# Altium PCB BOARD_4LAYER.PcbDoc (part 13 of 21)
Units mil, origin at the board's own origin, x right, y up, seen from the top; angles counter-clockwise.
Board outline 6692.91 x 10039.37 mil, 4 copper layers (Top Layer, Mid Layer 1, Mid Layer 2, Bottom Layer), stack 66.299 mil thick; 1532 components, 908 nets, 4105 pads, 1286 vias.
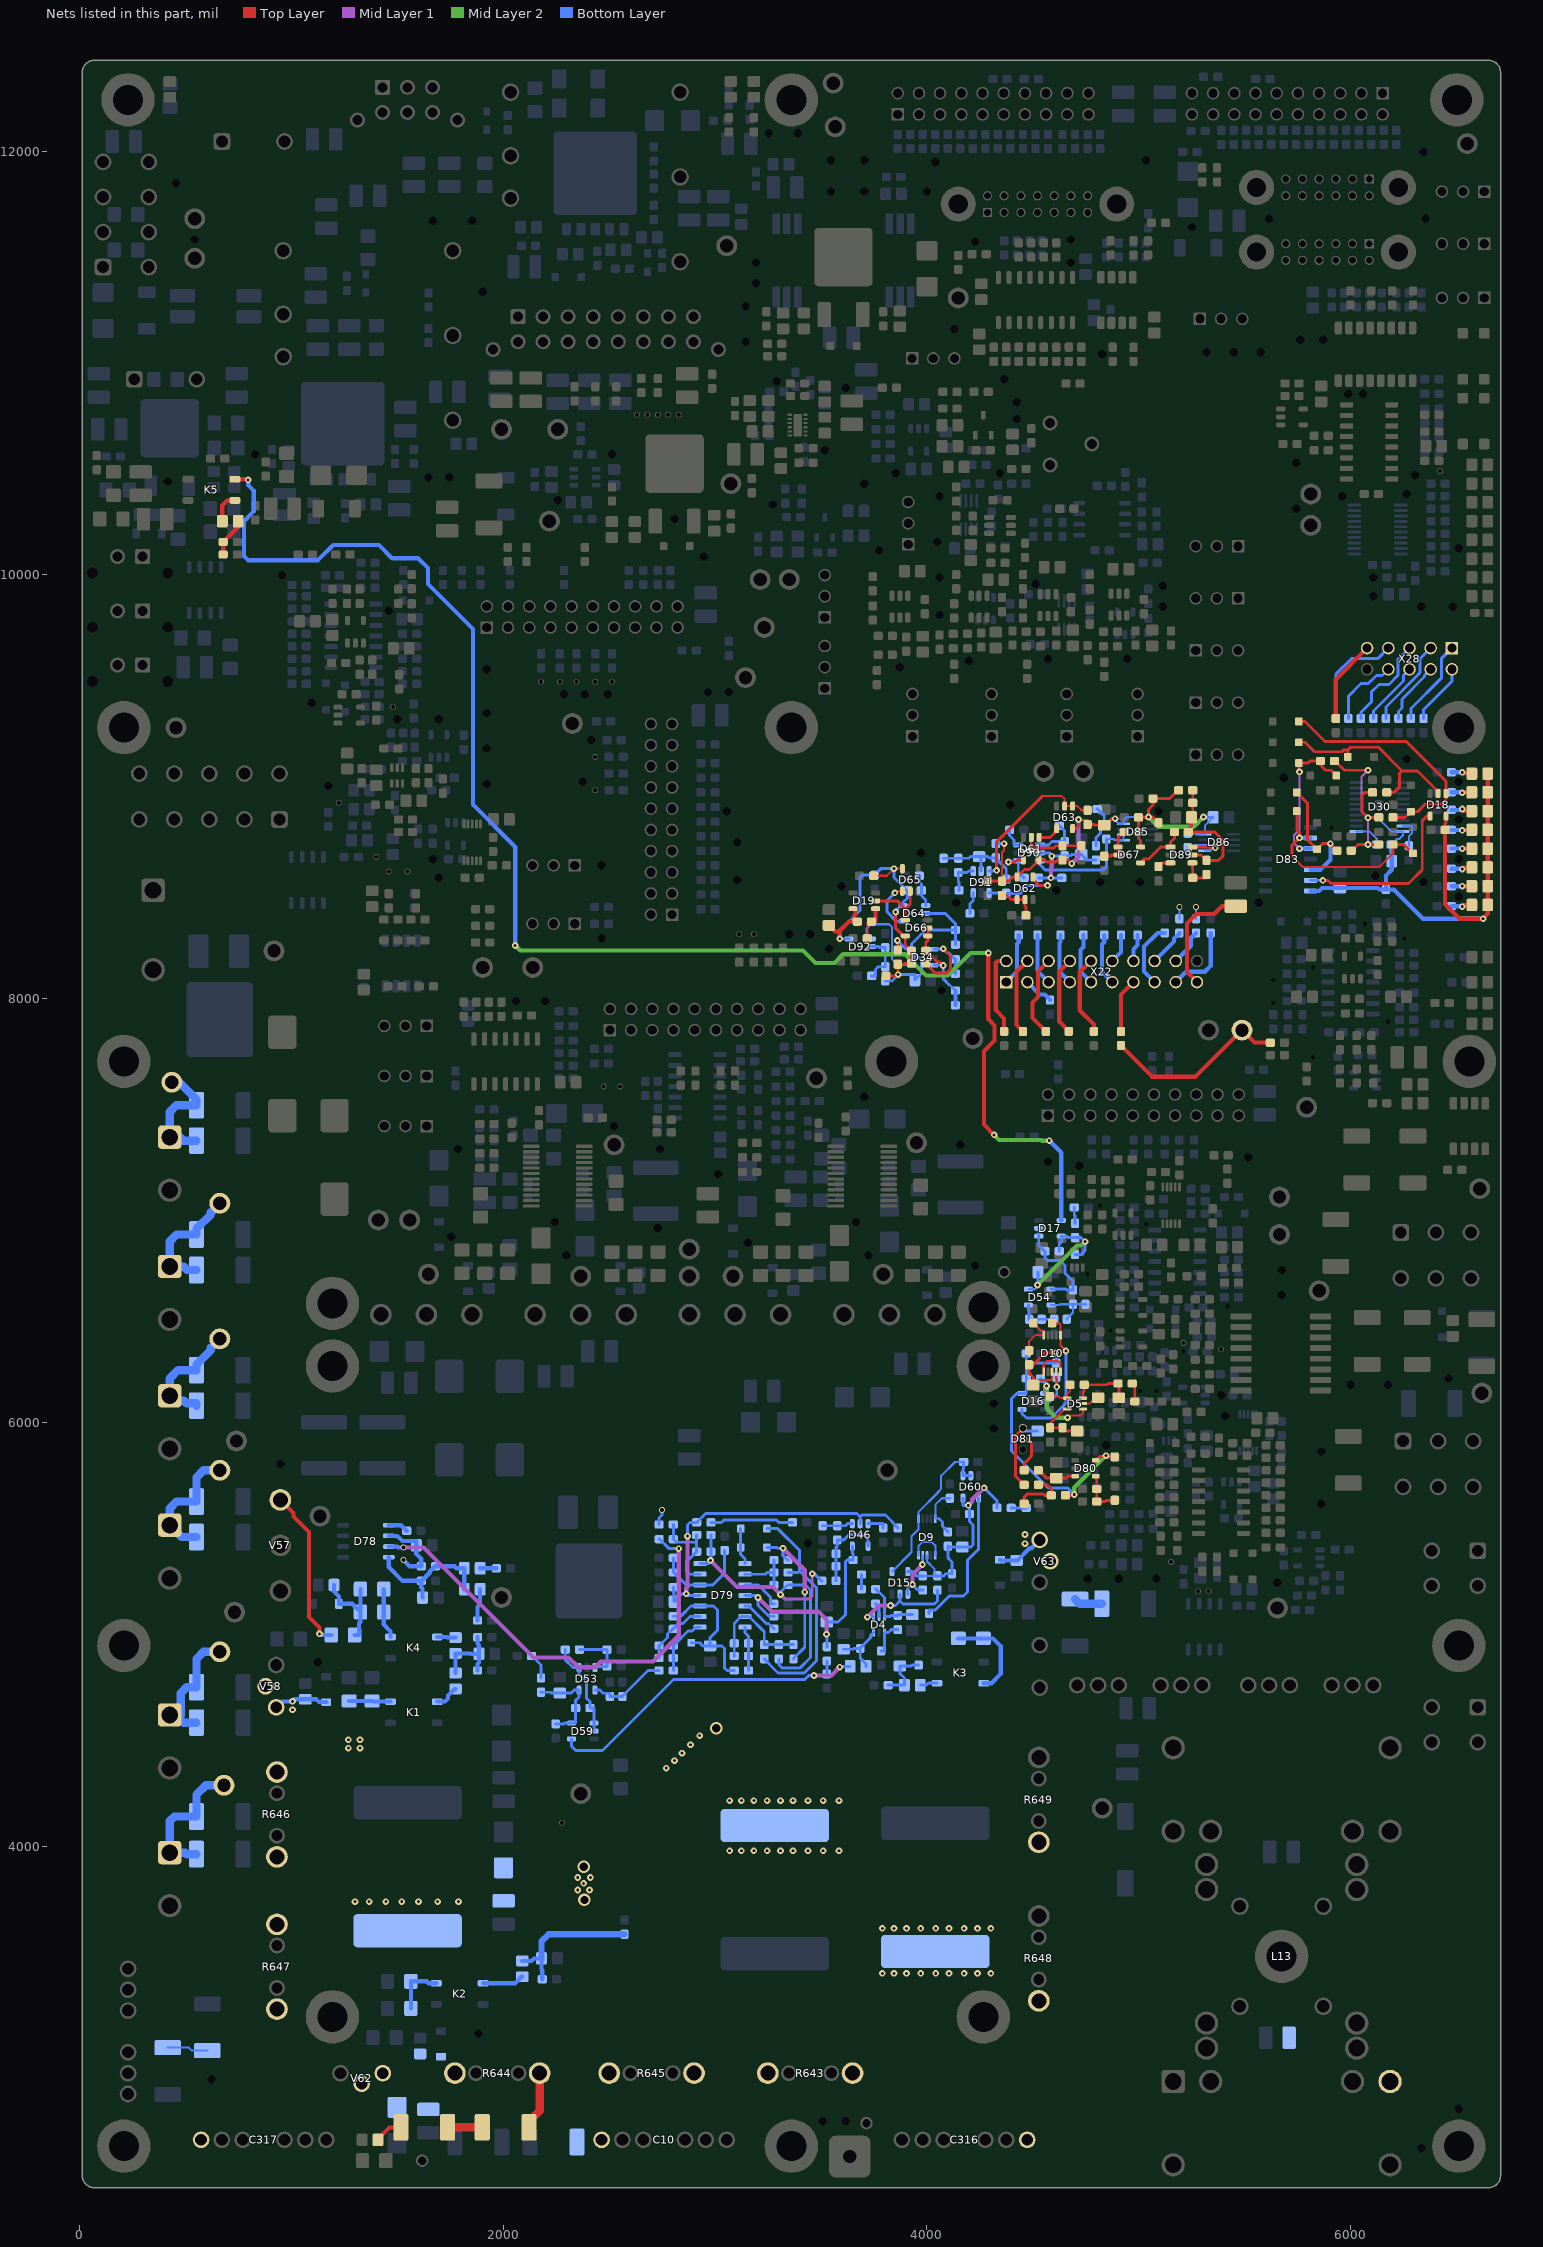
[diagram p15: the nets of this part, all layers, seen from the top]

## Via types
v1: diameter 27.56/31.5/31.5/27.56 (per signal layer), hole 13.78, Top Layer to Bottom Layer, 1270 vias
v2: diameter 59.06, hole 39.37, Top Layer to Bottom Layer, 16 vias

## Nets (pads, with @x,y where several pads share a name; then routed paths per layer and width w, separated by ;. In a path a pad name is that pad's centre, name@x,y a point inside that pad or via, vN(x,y) a via of type N, cw(c..) or ccw(c..) an arc to the next point about the centre after c; other vN are vias at no path point) (continued)
$6N106: C3.2 C10.2 R635.2 R643.2 R644.2 R645.2 R676.2 R677.2 V48.1 V49.1 V58.3 V59.1 V62.3 | length 257.3
  Bottom Layer w19.68: V58.3@929.13,4656.69 957.48,4685.04 v1(1005.91,4685.04) 1015.75,4694.88 R676.2@1066.93,4694.88 1118.03,4694.88 1130.83,4682.09 V48.1@1165.35,4682.09
  other v1: 1269.68,4464.57 1324.8,4464.57 1269.68,4503.94 1324.8,4503.94 1005.91,4645.67
$6N109: K1.4 R420.2 R421.2 | length 196.2
  Bottom Layer w19.68: R421.2@1273.62,4687.01 R420.2@1381.89,4687.01 1385.04,4683.86 K1.4@1468.5,4683.86
$6N111: K1.1 R688.2 | length 119.8
  Bottom Layer w19.68: K1.1@1688.98,4683.86 1725.47,4683.86 1740.66,4699.04 1740.66,4713.1 1771.65,4744.09 R688.2@1775.59,4744.09
$6N112: K2.4 R422.2 R423.2 | length 251.8
  Bottom Layer w19.68: R422.2@1564.96,3236.22 R423.2@1564.96,3364.17 1639.49,3364.17 1648.54,3355.12 K2.4@1685.04,3355.12
$6N114: K2.1 R689.2 | length 198
  Bottom Layer w19.68: K2.1@1905.51,3355.12 1942.01,3355.12 1942.29,3354.83 2055.62,3354.83 2086.61,3385.83 R689.2@2090.55,3385.83
$6N119: K3.4 R424.2 R425.2 | length 445.3
  Bottom Layer w19.68: R424.2@4147.64,4982.28 R425.2@4265.75,4982.28 4312.09,4982.28 4347.88,4946.49 4347.88,4814.53 4304.21,4770.87 K3.4@4267.72,4770.87
$6N121: K3.1 R690.2 | length 82.5
  Bottom Layer w13.78: R690.2@3968.5,4761.81 3997.32,4761.81 4006.38,4770.87 K3.1@4047.24,4770.87
$6N125: C71.2 C131.2 FB37.2 R688.1 R691.1 | length 365.9
  Bottom Layer w19.68: R688.1@1775.59,4818.9 R691.1@1775.59,4911.42 1847.36,4911.42 1849.33,4909.45 C131.2@1885.83,4909.45 ; FB37.2@1879.92,4830.71 1879.92,4862.2 1885.83,4868.11 C131.2@1885.83,4909.45 ; C71.2@1879.92,4988.19 1879.92,4956.69 1885.83,4950.79 C131.2@1885.83,4909.45
$6N127: R130.1 R131.2 | length 163.4
  Top Layer w39.37: R131.2@1738.19,2675.2 R130.1@1901.57,2675.2
$6N128: H2.1 R131.1 | length 135
  Top Layer w19.68: H2.1@1409.45,2616.14 1409.45,2620.08 1464.57,2675.2 R131.1@1517.72,2675.2
$6N134: R646.1 R647.1 V62.2
$6N135: C8.2 C317.2 L16.1 R646.2 R647.2 R678.2 V50.1 V58.2 V60.1 V63.3 | length 228.2
  Bottom Layer w19.68: V50.1@4344.49,5353.35 4347.44,5350.39 R678.2@4423.23,5350.39 4427.17,5350.39 4484.65,5407.88 4492.52,5407.88 V63.3@4531.5,5446.85
  other v1: 1301.18,3740.16 1368.11,3740.16 1446.85,3740.16 1521.65,3740.16 1600.39,3740.16 1690.94,3740.16 1789.37,3740.16 2352.36,3795.28 2407.48,3795.28 2379.92,3826.77 2352.36,3854.33 2411.42,3854.33 2769.68,4370.08 2809.06,4405.51 2844.49,4440.94 2883.86,4480.31 2927.17,4523.62 4462.6,5429.13 4462.6,5472.44
  other v2: 2383.86,3748.03 2379.92,3905.51 3005.91,4559.06
$6N688: R637.1 R638.2 | length 135
  Bottom Layer w39.37: R637.1@4698.82,5167.32 4720.47,5145.67 R638.2@4824.8,5145.67
$6N737: C5.1 C316.1 L13.2 L15.1
  other v1: 3789.37,3401.57 3844.49,3401.57 3903.54,3401.57 3970.47,3401.57 4041.34,3401.57 4104.33,3401.57 4175.2,3401.57 4238.19,3401.57 4301.18,3401.57 3789.37,3614.17 3844.49,3614.17 3903.54,3614.17 3970.47,3614.17 4041.34,3614.17 4104.33,3614.17 4175.2,3614.17 4238.19,3614.17 4301.18,3614.17
$6N888: R639.1 R640.2 | length 192.7
  Bottom Layer w10: R640.2@417.32,3051.18 516.65,3051.18 530.43,3037.4 R639.1@604.33,3037.4
$6N889: R684.2 V57.1 | length 766.5
  Top Layer w19.68: V57.1@948.82,5636.22 1010.91,5574.13 1010.91,5557.71 1083.94,5484.67 1083.94,5083.38 1133.86,5033.46 v1(1133.86,5003.94)
  Bottom Layer w19.68: v1(1133.86,5003.94) 1139.76,4998.03 R684.2@1188.98,4998.03
$6N890: R426.1 R427.1 R679.1 R684.1 V51.2 | length 456.7
  Bottom Layer w19.68: R679.1@1202.76,5234.25 1202.76,5202.83 1225.39,5180.2 V51.2@1225.39,5145.67 1288.4,5145.67 1288.4,5144.67 R427.1@1326.77,5106.3 ; R684.1@1299.21,4998.03 1320.55,4998.03 1320.55,5053.74 1326.77,5059.96 R427.1@1326.77,5106.3 ; R426.1@1326.77,5214.57 R427.1@1326.77,5106.3
$6N893: K4.4 R426.2 R427.2 | length 238.6
  Bottom Layer w19.68: R426.2@1437.01,5214.57 R427.2@1437.01,5106.3 1437.01,5047.13 1468.5,5015.63 K4.4@1468.5,4988.98
$6N979: R693.1 R694.1 TP12.1 X9.1 | length 568
  Bottom Layer w39.37: TP12.1@437.01,7606.3 472.44,7606.3 553.15,7525.59 R693.1@553.15,7498.03 458.99,7498.03 427.17,7466.2 X9.1@427.17,7347.44 475.39,7347.44 492.13,7330.71 R694.1@553.15,7330.71
$6N987: R695.1 R696.1 TP13.1 X10.1 | length 585.5
  Bottom Layer w39.37: R695.1@553.15,6720.47 506.81,6720.47 506.81,6723.58 493.19,6737.2 X10.1@427.17,6737.2 427.17,6855.12 459.84,6887.8 R696.1@553.15,6887.8 553.15,6915.35 620.88,6983.08 620.88,6992.92 TP13.1@663.39,7035.43
$6N1010: R697.1 R698.1 TP14.1 X11.1 | length 581.3
  Bottom Layer w39.37: R697.1@553.15,6080.71 553.15,6091.38 506.81,6091.38 493.19,6105 427.17,6105 X11.1@427.17,6126.97 427.17,6208.17 467.02,6248.03 R698.1@553.15,6248.03 553.15,6275.59 620.88,6343.32 620.88,6353.16 TP14.1@663.39,6395.67
$6N1033: R699.1 R700.1 TP15.1 X12.1 | length 605.7
  Bottom Layer w39.37: R699.1@553.15,5460.63 483.27,5460.63 X12.1@427.17,5516.73 427.17,5595.3 459.81,5627.95 R700.1@553.15,5627.95 553.15,5742.26 586.48,5775.59 TP15.1@663.39,5775.59
$6N1038: R701.1 R702.1 TP16.1 X13.1 | length 611.2
  Bottom Layer w39.37: X13.1@427.17,4621.06 X13.1@455.71,4621.06 ; R701.1@553.15,4584.65 492.13,4584.65 X13.1@455.71,4621.06 ; TP16.1@663.39,4919.29 586.4,4919.29 553.15,4886.04 R702.1@553.15,4751.97 507.22,4751.97 479.38,4724.13 479.38,4621.06 X13.1@455.71,4621.06
$6N1043: R703.1 R704.1 TP17.1 X14.1 | length 664.2
  Bottom Layer w39.37: R703.1@553.15,3964.57 506.81,3964.57 499.92,3971.46 X14.1@427.17,3971.46 427.17,4120.4 448.5,4141.73 R704.1@553.15,4141.73 553.15,4245.09 597.43,4289.37 TP17.1@683.07,4289.37
$6N1115: K4.1 R691.2 | length 87.8
  Bottom Layer w19.68: K4.1@1688.98,4988.98 1732.4,4988.98 1735.16,4986.22 R691.2@1775.59,4986.22
$6N2201: C98.2 D4.5 | length 67.5
  Bottom Layer w13.78: C98.2@3757.87,5145.67 3773.62,5129.92 D4.5@3773.62,5084.65
$6N2203: D4.1 R90.2 R275.1 | length 171.2
  Bottom Layer w13.78: R90.2@3783.46,4923.23 3799.21,4923.23 D4.1@3799.21,5009.84 3817.99,5009.84 3831.61,5023.46 3831.61,5023.62 R275.1@3862.2,5023.62
$6N2204: D4.4 D15.2 R276.1 | length 489.1
  Mid Layer 1 w19.68: v1(3718.5,5082.68) 3773.62,5137.8 v1(3828.74,5137.8)
  Bottom Layer w13.78: v1(3718.5,5082.68) 3720.47,5084.65 D4.4@3748.03,5084.65 ; v1(3828.74,5137.8) 3851.4,5137.8 3853.43,5139.82 3853.48,5139.82 3872.05,5158.39 ; D15.2@3872.05,5190.94 3872.05,5158.39 ; R276.1@4049.21,5210.63 4049.21,5158.57 4034.57,5143.93 3886.5,5143.93 3872.05,5158.39
$6N2205: D9.9 D15.1 R277.1 | length 277.5
  Mid Layer 1 w19.68: v1(3931.1,5236.22) 3931.1,5283.46 v1(3978.35,5330.71)
  Bottom Layer w10: v1(3978.35,5330.71) 3980.32,5332.68 D9.9@3980.32,5374.02
  Bottom Layer w13.78: D15.1@3909.45,5190.94 3909.45,5223.5 3922.17,5236.22 v1(3931.1,5236.22) 3956.69,5210.63 R277.1@3980.32,5210.63
$6N2206: D9.6 D9.10 | length 184.6
  Bottom Layer w10: D9.10@3960.63,5374.02 3960.63,5419.71 3977.63,5436.71 4023.02,5436.71 4039.37,5420.36 D9.6@4039.37,5374.02
$6N2207: C103.2 D4.3 R153.2 R314.2 | length 277.3
  Bottom Layer w13.78: C103.2@3606.3,4931.1 3650.51,4931.1 3654.45,4935.04 R153.2@3685.04,4935.04 ; R314.2@3712.6,4850.39 3712.6,4861.2 3685.04,4888.76 R153.2@3685.04,4935.04 ; D4.3@3748.03,5009.84 3732.61,4994.43 3732.61,4984.58 3685.04,4937.01 R153.2@3685.04,4935.04
$6N2209: FB30.1 R198.1 | length 68.9
  Bottom Layer w13.78: R198.1@3690.94,5214.57 FB30.1@3690.94,5283.46
$6N2210: C129.2 D4.6 R198.2 R275.2 | length 284.2
  Bottom Layer w13.78: R198.2@3757.87,5214.57 3759.84,5214.57 3799.21,5175.2 D4.6@3799.21,5084.65 3825.71,5084.65 3831.61,5090.55 R275.2@3862.2,5090.55 3866.14,5094.49 C129.2@3931.1,5094.49
$6N2213: D9.5 R91.2 R278.2 | length 244.6
  Bottom Layer w10: 4056.97,5547.24 D9.5@4039.37,5547.24 4039.37,5612.17 4070.91,5643.7 R91.2@4108.27,5643.7
  Bottom Layer w13.78: 4056.97,5547.24 4073.34,5530.88 4073.34,5511.31 4098.43,5486.22 R278.2@4098.43,5484.25
$6N2214: C63.2 C128.2 C210.2 D9.8 D15.5 D60.5 R202.2 R276.2 R277.2 R278.1 | length 1086.3
  Mid Layer 1 w19.68: v1(4194.88,5610.24) 4213.73,5629.08 4213.73,5636.96 v1(4269.69,5692.91)
  Bottom Layer w10: R277.2@3980.32,5277.56 4034.79,5277.56 4034.79,5310.12 4000,5344.9 D9.8@4000,5374.02
  Bottom Layer w13.78: D15.5@3909.45,5297.24 3930.04,5297.24 3949.72,5277.56 R277.2@3980.32,5277.56 ; R276.2@4034.79,5277.56 R276.2@4049.21,5277.56 4079.8,5277.56 4087.52,5285.28 4087.52,5287.4 C63.2@4118.11,5287.4 4118.11,5342.97 4098.43,5362.65 R278.1@4098.43,5417.32 4102.36,5413.39 C128.2@4167.32,5413.39 4207.76,5413.39 4217.64,5423.27 4217.64,5517.86 4200.79,5534.72 C210.2@4200.79,5568.9 4200.79,5604.33 v1(4194.88,5610.24) 4192.91,5610.24 4191.93,5609.25 4169.29,5609.25 D60.5@4169.29,5643.7 ; v1(4269.69,5692.91) 4330.71,5631.89 R202.2@4330.71,5598.43
$6N2215: D9.1 D15.4 D60.1 D60.2 R92.2 | length 785.9
  Bottom Layer w10: D15.4@3834.65,5297.24 3927.11,5389.71 3927.11,5464.86 3960.63,5498.38 D9.1@3960.63,5547.24 3960.63,5579.16 4051.89,5670.42 4051.89,5673.09 4066.94,5688.15 4066.94,5749.49 4132.41,5814.96 R92.2@4173.23,5814.96
  Bottom Layer w13.78: R92.2@4173.23,5814.96 4173.23,5784.37 4171.94,5783.08 4171.94,5782.56 4169.29,5779.91 D60.1@4169.29,5750 D60.2@4206.69,5750
$6N2217: D79.2 R364.1 R365.2 R366.2 | length 257.4
  Bottom Layer w13.78: D79.2@3141.73,5285.04 3236.73,5285.04 3245,5293.31 R366.2@3277.56,5293.31 ; R364.1@3277.56,5234.25 R366.2@3277.56,5293.31 ; R365.2@3277.56,5352.36 R366.2@3277.56,5293.31
$6N2218: D79.3 R93.1 | length 190.8
  Bottom Layer w13.78: D79.3@3141.73,5235.04 3202.35,5235.04 3261.13,5176.26 3261.13,5145.67 R93.1@3277.56,5145.67
$6N2219: D79.5 R94.1 | length 180.3
  Bottom Layer w13.78: D79.5@3141.73,5135.04 3158.91,5135.04 3241.3,5052.65 3252.47,5052.65 R94.1@3277.56,5027.56
$6N2220: D79.1 V19.2 V20.1 | length 173.5
  Bottom Layer w13.78: V20.1@3121.06,5500 V19.2@3121.06,5411.42 3121.06,5378.43 3141.73,5357.76 D79.1@3141.73,5335.04
$6N2221: R366.1 R367.2 V20.2 | length 1107.3
  Bottom Layer w13.78: R367.2@3232.28,4885.83 3257.37,4860.74 3257.37,4858.77 3297.01,4819.13 3421.16,4819.13 3479.6,4877.57 3479.6,5220.33 3399.55,5300.38 3399.24,5300.38 ; V20.2@3245.08,5500 3295.62,5500 3399.24,5396.37 3399.24,5300.38 ; R366.1@3344.49,5293.31 3392.17,5293.31 3399.24,5300.38
$6N2222: D46.3 R95.1 | length 91.1
  Bottom Layer w13.78: D46.3@3722.44,5523.62 3745.16,5523.62 3745.52,5523.99 3793.31,5523.99 R95.1@3793.31,5503.94
$6N2223: C242.2 D46.1 R493.2 | length 143.8
  Bottom Layer w13.78: R493.2@3507.87,5513.78 C242.2@3576.77,5513.78 3615.08,5513.78 3624.92,5523.62 D46.1@3647.64,5523.62
$6N2224: C244.2 D79.7 R370.2 R406.1 | length 210.9
  Bottom Layer w13.78: D79.7@3141.73,5035.04 3141.73,5008.66 3157.48,4992.91 R406.1@3157.48,4958.66 C244.2@3157.48,4899.61 R370.2@3157.48,4830.71
$6N2225: C218.1 D79.9 R368.2 R671.2 | length 317.6
  Bottom Layer w13.78: C218.1@2736.22,4889.76 R671.2@2736.22,4948.82 2738.19,4948.82 2776.09,4986.72 2776.09,5002.47 2801.18,5027.56 R368.2@2803.15,5027.56 2828.24,5052.65 2849.19,5052.65 2881.58,5085.04 D79.9@2929.13,5085.04
$6N2226: C241.2 D79.14 R364.2 R373.1 R405.2 R667.2 | length 1612.4
  Mid Layer 1 w13.78: v1(3309.06,5188.98) 3328.94,5169.09 3444.19,5169.09 3458.66,5183.56 v1(3458.66,5287.4)
  Mid Layer 1 w19.68: v1(2978.35,5350.39) 3104.33,5224.41 3273.62,5224.41 v1(3309.06,5188.98)
  Bottom Layer w13.78: D79.14@2929.13,5335.04 2970.55,5335.04 v1@2978.35,5342.83 ; v1(2978.35,5350.39) v1@2978.35,5342.83 ; C241.2@2980.32,5470.47 R373.1@2980.32,5391.73 2980.32,5344.8 v1@2978.35,5342.83 ; R405.2@3301.18,4885.83 3301.18,4857.97 3315.68,4843.48 3401.85,4843.48 3450.84,4892.46 3450.84,5210.95 3427.3,5234.48 3379.16,5234.48 3378.94,5234.25 R364.2@3344.49,5234.25 3342.52,5234.25 3309.06,5200.79 v1(3309.06,5188.98) ; v1(3458.66,5287.4) 3468.5,5287.4 3501.97,5253.94 R667.2@3503.94,5253.94
$6N2227: C69.2 D79.12 R407.2 R408.2 | length 465.9
  Bottom Layer w13.78: R407.2@2803.15,5362.2 C69.2@2803.15,5293.31 2805.12,5293.31 2863.39,5235.04 D79.12@2929.13,5235.04 2990.97,5235.04 3045.28,5289.35 R408.2@3045.28,5397.64
$6N2229: C242.1 C243.1 D46.4 R404.2 R667.1 | length 396.6
  Bottom Layer w13.78: R667.1@3570.87,5253.94 C243.1@3570.87,5322.83 R404.2@3570.87,5381.89 3570.87,5412.48 3572.68,5414.29 3576.77,5414.29 C242.1@3576.77,5446.85 3607.36,5446.85 3633.78,5473.27 3699.05,5473.27 3722.44,5449.88 D46.4@3722.44,5417.32
$6N2230: C299.1 D53.4 R371.2 R533.2 | length 375.7
  Bottom Layer w13.78: D53.4@2433.07,4738.19 2456.58,4738.19 2471.46,4723.31 2503.94,4723.31 R533.2@2503.94,4708.66 C299.1@2562.99,4708.66 2562.99,4710.63 2683.07,4830.71 R371.2@2736.22,4830.71
$6N2233: FB31.2 R199.2 | length 124.2
  Bottom Layer w10: FB31.2@2133.86,4899.61 FB31.2@2135.83,4899.61
  Bottom Layer w13.78: FB31.2@2135.83,4899.61 2179.13,4856.3 R199.2@2179.13,4795.28
$6N2234: C315.2 D79.10 R369.2 R370.1 V21.2 | length 731.7
  Bottom Layer w13.78: R369.2@2803.15,5086.61 2838.35,5086.61 2886.78,5135.04 D79.10@2929.13,5135.04 2992.76,5135.04 3011.62,5116.18 3011.62,5020.48 2976.38,4985.24 C315.2@2976.38,4946.85 ; V21.2@2887.8,4961.61 2927.61,4961.61 2942.37,4946.85 C315.2@2976.38,4946.85 ; R370.1@3090.55,4830.71 3056.1,4830.71 3045.21,4841.6 3045.21,4934.55 3032.91,4946.85 C315.2@2976.38,4946.85
$6N2235: D53.3 R372.2 R374.2 R660.1 | length 268.2
  Bottom Layer w13.78: R660.1@2360.24,4929.13 R372.2@2490.16,4929.13 R374.2@2490.16,4850.39 2444.3,4850.39 2438.4,4844.49 D53.3@2433.07,4844.49
$6N2237: C65.2 C189.1 C208.2 D46.2 D79.11 R201.1 | length 1622.3
  Mid Layer 1 w19.68: v1(2864.17,5192.91) 2864.17,5219.57 2870.08,5225.47 v1(2870.08,5464.57)
  Bottom Layer w13.78: C65.2@2803.15,5224.41 2804.22,5223.34 2804.22,5195.94 2807.09,5193.08 C189.1@2807.09,5155.51 2844.49,5192.91 v1(2864.17,5192.91) 2872.05,5185.04 D79.11@2929.13,5185.04 ; v1(2870.08,5464.57) 2870.08,5517.28 2882.33,5529.53 R201.1@2913.39,5529.53 2938.48,5554.62 2940.44,5554.62 2940.44,5556.59 2955.24,5571.38 3669.84,5571.38 3685.04,5556.18 ; D46.2@3685.04,5523.62 3685.04,5556.18 ; C208.2@3862.2,5503.94 3837.11,5529.03 3837.11,5531 3803.7,5564.41 3693.27,5564.41 3685.04,5556.18
$6N2238: C64.2 C190.1 C209.2 D46.5 D79.4 R200.1 | length 1211.5
  Mid Layer 1 w19.68: v1(3202.76,5175.2) 3269.69,5108.27 3488.19,5108.27 3525.59,5070.87 v1(3525.59,5001.97)
  Bottom Layer w13.78: D79.4@3141.73,5185.04 3192.91,5185.04 v1(3202.76,5175.2) 3202.76,5138.24 3242.54,5098.46 3243.11,5098.46 3254.96,5086.61 C64.2@3277.56,5086.61 ; R200.1@3527.56,4942.91 3527.56,5000 v1(3525.59,5001.97) 3527.56,5003.94 C190.1@3527.56,5059.06 3580.17,5059.06 3615.07,5093.95 3615.07,5345.29 3622.14,5352.36 C209.2@3651.57,5352.36 3651.57,5382.95 3649.45,5382.95 3647.64,5384.76 D46.5@3647.64,5417.32
$6N2239: C66.2 C130.2 D53.5 D59.5 R199.1 R279.2 | length 444.8
  Bottom Layer w13.78: R199.1@2179.13,4728.35 2223.35,4728.35 2227.28,4724.41 C130.2@2267.72,4724.41 2321.77,4724.41 2335.55,4738.19 D53.5@2358.27,4738.19 2358.27,4705.63 2358.05,4705.63 2342.52,4690.1 R279.2@2342.52,4653.54 2342.52,4582.68 D59.5@2322.83,4582.68 2290.28,4582.68 2286.34,4578.74 C66.2@2248.03,4578.74
$6N2240: D53.1 D59.1 D59.2 R279.1 R660.2 | length 467.9
  Bottom Layer w13.78: R660.2@2293.31,4929.13 2293.31,4881.65 2330.47,4844.49 D53.1@2358.27,4844.49 2358.27,4817.23 2393.62,4781.88 2393.62,4699.96 2409.45,4684.13 R279.1@2409.45,4653.54 2429.13,4653.54 D59.1@2429.13,4582.68 D59.2@2429.13,4545.28
$6N2241: C218.2 D79.8 R371.1 R671.1 | length 279.8
  Bottom Layer w13.78: R371.1@2803.15,4830.71 C218.2@2803.15,4889.76 R671.1@2803.15,4948.82 2805.12,4948.82 2872.97,5016.67 2892.06,5016.67 2910.43,5035.04 D79.8@2929.13,5035.04
$6N2242: D59.4 R314.1 | length 1522.2
  Mid Layer 1 w19.68: v1(3466.54,4807.09) 3549.21,4807.09 v1(3588.58,4846.46)
  Bottom Layer w13.78: D59.4@2322.83,4507.87 2322.83,4473.59 2343.15,4453.27 2468.92,4453.27 2804.22,4788.56 3423.33,4788.56 3441.85,4807.09 v1(3466.54,4807.09) ; v1(3588.58,4846.46) 3592.52,4850.39 R314.1@3637.8,4850.39
$6N2243: R365.1 R534.2 V19.1 | length 732.4
  Mid Layer 1 w19.68: v1(3320.87,5407.48) 3423.23,5305.12 v1(3423.23,5200.79)
  Bottom Layer w13.78: V19.1@3245.08,5411.42 3292.24,5411.42 3296.18,5407.48 v1(3320.87,5407.48) 3320.87,5381.84 3317.43,5378.41 3317.43,5377.45 3342.52,5352.36 R365.1@3344.49,5352.36 ; R534.2@3370.08,4885.83 3370.08,4887.8 3423.23,4940.94 v1(3423.23,5200.79)
$6N2244: C244.1 D79.6 R367.1 R405.1 R406.2 R534.1 | length 536.1
  Bottom Layer w13.78: C244.1@3090.55,4899.61 R406.2@3090.55,4958.66 3090.55,5052.56 3123.03,5085.04 D79.6@3141.73,5085.04 3160.43,5085.04 3232.28,5013.19 R367.1@3232.28,4952.76 R405.1@3301.18,4952.76 R534.1@3370.08,4952.76
$6N2245: OSC27.1 R375.2 | length 74.7
  Bottom Layer w13.78: R375.2@2736.22,5519.69 2736.22,5550.28 2749.84,5563.9 2750,5563.9 OSC27.1@2750,5588.58
$6N2246: C241.1 D79.13 R363.1 R373.2 R375.1 | length 446.4
  Bottom Layer w13.78: R375.1@2803.15,5519.69 R363.1@2803.15,5450.79 2817.99,5435.94 2909.45,5435.94 2913.39,5439.88 ; C241.1@2913.39,5470.47 2913.39,5439.88 ; D79.13@2929.13,5285.04 2880.41,5285.04 2866.3,5299.15 2866.3,5344.64 R373.2@2913.39,5391.73 2913.39,5439.88
$6N2271: FB33.2 R201.2 | length 394.7
  Bottom Layer w13.78: R201.2@2980.32,5529.53 3030.5,5529.53 3041.18,5540.21 3289.79,5540.21 3300.47,5529.53 FB33.2@3366.14,5529.53
$6N2272: D78.7 OSC28.1 R363.2 | length 2187.5
  Mid Layer 1 w19.68: OSC28.1@1529.53,5411.42 1625.31,5411.42 2144.03,4892.7 2309.16,4892.7 2355.56,4846.3 2433.88,4846.3 2460.75,4873.17 2707.06,4873.17 2828.74,4994.85 v1(2828.74,5405.51)
  Bottom Layer w13.78: R363.2@2736.22,5450.79 2738.19,5450.79 2783.46,5405.51 v1(2828.74,5405.51)
  Bottom Layer w19.68: D78.7@1460.63,5415.75 1500.51,5415.75 1504.84,5411.42 OSC28.1@1529.53,5411.42
$6N2274: FB34.2 R687.2 | length 76.8
  Bottom Layer w19.68: R687.2@1891.73,5312.99 FB34.2@1968.5,5312.99
$6N2275: C323.2 D78.6 OSC29.1 R535.2 | length 365.7
  Bottom Layer w19.68: D78.6@1460.63,5466.14 1500.33,5466.14 1524.58,5441.89 1590.55,5441.89 C323.2@1590.55,5421.26 1590.55,5380.83 1614.17,5357.2 R535.2@1614.17,5322.83 1559.06,5322.83 OSC29.1@1529.53,5352.36
$6N2276: C67.2 C191.1 D78.8 R535.1 R567.1 R687.1 | length 645.1
  Bottom Layer w19.68: D78.8@1460.63,5365.35 1460.63,5319.28 1525.98,5253.94 C67.2@1614.17,5253.94 ; C191.1@1620.08,5175.2 1620.08,5216.54 1614.17,5222.44 C67.2@1614.17,5253.94 ; R567.1@1816.93,5214.57 R687.1@1816.93,5312.99 1780.43,5312.99 1770.59,5322.83 R535.1@1681.1,5322.83 1679.13,5322.83 1654.04,5297.74 1654.04,5291.84 1616.14,5253.94 C67.2@1614.17,5253.94
$6N2277: FB32.2 R200.2 | length 61
  Bottom Layer w13.78: FB32.2@3527.56,4814.96 R200.2@3527.56,4875.98
$6N2278: D78.5 R96.2 | length 95.6
  Bottom Layer w19.68: D78.5@1460.63,5516.54 1516.93,5516.54 1543.31,5490.16 R96.2@1545.28,5490.16
$6N3139: D60.4 R97.2 | length 697.7
  Bottom Layer w13.78: R97.2@4009.84,5100.39 4009.84,5117.1 4040.43,5117.1 4105.21,5181.88 4172.58,5181.88 4191.7,5200.99 4191.7,5351.26 4244.09,5403.65 D60.4@4244.09,5643.7
$6N3156: L14.2 R130.2 R643.1 R644.1 R645.1 | length 276.8
  Top Layer w39.37: R130.2@2122.05,2675.2 2122.05,2702.76 2172.44,2753.15 R644.1@2172.44,2931.1
  other v1: 3068.9,3980.32 3124.02,3980.32 3183.07,3980.32 3246.06,3980.32 3309.06,3980.32 3368.11,3980.32 3438.98,3980.32 3509.84,3980.32 3584.65,3980.32 3068.9,4216.54 3124.02,4216.54 3183.07,4216.54 3246.06,4216.54 3309.06,4216.54 3368.11,4216.54 3438.98,4216.54 3509.84,4216.54 3584.65,4216.54
$6N3315: R648.2 R649.2 V63.2
$6N3434: FB29.1 R202.1 | length 70.9
  Bottom Layer w13.78: R202.1@4397.64,5598.43 FB29.1@4468.5,5598.43
$6N3601: C68.2 C133.2 FB35.2 R690.1 | length 266.5
  Bottom Layer w13.78: FB35.2@3816.93,4761.81 R690.1@3893.7,4761.81 3893.7,4795.06 3872.05,4816.72 C133.2@3872.05,4852.36 3926.1,4852.36 3930.04,4856.3 C68.2@3960.63,4856.3
$6N3602: C70.2 C132.2 FB36.2 R689.1 | length 681.7
  Bottom Layer w19.68: R689.1@2090.55,3460.63 2134.56,3460.63 2146.37,3472.44 C132.2@2181.1,3472.44 2181.1,3420.28 2185.04,3416.34 C70.2@2185.04,3374.02
  Bottom Layer w29.53: C132.2@2181.1,3472.44 2181.1,3553.01 2214.7,3586.61 FB36.2@2572.83,3586.61
$6N3670: FB38.2 R567.2 | length 152.5
  Bottom Layer w19.68: FB38.2@1879.92,5066.93 1879.92,5129.92 1891.73,5141.73 R567.2@1891.73,5214.57
$7N52: C266.2 D5.5 | length 82.3
  Top Layer w10: D5.5@4736.22,6090.55 4768.72,6090.55 4796.28,6118.11 C266.2@4807.09,6118.11
$7N54: D5.1 R98.2 R280.1 | length 152.8
  Top Layer w10: R98.2@4580.71,6124.02 4621.52,6124.02 4629.4,6116.14 D5.1@4661.42,6116.14 4661.42,6134.92 4675.04,6148.54 4675.2,6148.54 R280.1@4675.2,6179.13
$7N55: D10.9 D16.2 R281.1 | length 224.7
  Top Layer w10: D10.9@4610.24,6240.16 4610.24,6208.78 4612.2,6206.81 v1(4612.2,6169.29)
  Bottom Layer w13.78: D16.2@4555.12,6100.39 4579.69,6100.39 4612.2,6132.91 v1(4612.2,6169.29) 4610.24,6171.26 R281.1@4610.24,6214.57
$7N56: D10.6 D10.10 | length 165.8
  Top Layer w10: D10.6@4551.18,6240.16 4551.18,6277.86 4564.92,6291.6 4616.63,6291.6 4629.92,6278.3 D10.10@4629.92,6240.16
$7N57: C265.2 D5.3 R154.2 R707.2 | length 263.4
  Top Layer w10: R154.2@4580.71,5976.38 4580.71,5996.06 4649.61,6064.96 D5.3@4661.42,6064.96
  Top Layer w13.78: R154.2@4580.71,5976.38 R707.2@4639.76,5976.38 4655.51,5960.63 C265.2@4708.66,5960.63
$7N58: D81.2 R409.1 | length 191.6
  Top Layer w13.78: D81.2@4452.76,5923.23 4475.56,5923.23 4492.65,5906.14 4492.65,5842.06 4458.66,5808.07 R409.1@4458.66,5775.59
$7N59: C264.2 D80.3 R409.2 | length 192.8
  Top Layer w13.78: R409.2@4525.59,5775.59 4527.56,5775.59 4564.96,5738.19 C264.2@4610.24,5738.19 4655.51,5738.19 4665.35,5748.03 D80.3@4698.82,5748.03
$7N61: FB40.1 R204.1 | length 89.5
  Top Layer w13.78: R204.1@4968.5,6185.04 4980.31,6173.23 FB40.1@4980.31,6100.39
$7N63: C99.1 D80.4 R377.1 R378.2 | length 208.8
  Top Layer w13.78: D80.4@4797.24,5748.03 4797.24,5736.14 4801.18,5732.2 R377.1@4801.18,5687.01 C99.1@4801.18,5627.95 4841.54,5627.95 4847.44,5633.86 R378.2@4885.83,5633.86
$7N65: C137.2 D5.6 R204.2 R280.2 | length 295.9
  Top Layer w10: D5.6@4736.22,6116.14 4736.22,6142.64 4742.13,6148.54 R280.2@4742.13,6179.13
  Top Layer w13.78: R280.2@4742.13,6179.13 4849.53,6179.13 4855.43,6185.04 R204.2@4901.57,6185.04 4901.57,6179.13 4905.51,6175.2 C137.2@4905.51,6118.11
$7N66: C300.1 D54.4 R205.2 R536.2 | length 186.7
  Bottom Layer w13.78: D54.4@4478.35,6555.12 4478.35,6528.54 4482.28,6524.61 R205.2@4482.28,6488.19 C300.1@4541.34,6488.19 R536.2@4600.39,6488.19
$7N69: FB41.2 R203.2 | length 76.4
  Bottom Layer w13.78: FB41.2@4694.88,7015.75 4694.88,6981.3 4698.82,6977.36 R203.2@4698.82,6940.94
$7N70: D54.3 R376.2 R661.1 R663.2 | length 248.1
  Bottom Layer w10: D54.3@4584.65,6555.12 4624.54,6555.12 4628.38,6558.96 4658.29,6558.96 4658.39,6559.06 R661.1@4688.98,6559.06 4688.98,6519.69 4659.45,6490.16 R376.2@4659.45,6488.19
  Bottom Layer w13.78: R661.1@4688.98,6559.06 R663.2@4748.03,6559.06
$7N72: C73.2 C136.2 D17.5 D54.5 R203.1 R284.2 | length 727
  Mid Layer 2 w19.68: v1(4521.65,6649.61) 4707.53,6835.48 4727.22,6835.48 v1(4746.06,6854.33)
  Bottom Layer w10: D54.5@4478.35,6629.92 4507.8,6629.92 v1@4521.65,6643.78
  Bottom Layer w13.78: v1(4521.65,6649.61) 4521.65,6643.78 4523.62,6645.75 C136.2@4523.62,6710.63 ; R284.2@4624.02,6809.06 4624.02,6843.5 4633.86,6853.35 D17.5@4633.86,6879.92 4660.43,6879.92 4666.34,6874.02 R203.1@4698.82,6874.02 4726.38,6874.02 v1(4746.06,6854.33) 4746.06,6811.74 4727.63,6793.31 C73.2@4698.82,6793.31
$7N73: D17.1 D17.2 D54.1 R284.1 R661.2 | length 499.6
  Bottom Layer w13.78: D17.2@4527.56,6917.32 D17.1@4527.56,6879.92 4527.56,6836.61 4555.12,6809.06 R284.1@4557.09,6809.06 4557.09,6778.46 4569.77,6765.78 4628.36,6765.78 4651.78,6742.36 4651.78,6705.24 4688.98,6668.04 R661.2@4688.98,6625.98 4659.71,6625.98 4655.77,6629.92 D54.1@4584.65,6629.92
$7N76: C139.2 D81.1 R206.1 | length 371.3
  Top Layer w13.78: D81.1@4452.76,5973.23 4418.69,5939.16 4418.69,5746.67 R206.1@4458.66,5706.69
  Bottom Layer w13.78: D81.1@4452.76,5973.23 4465.35,5960.63 C139.2@4521.65,5960.63
$7N77: FB39.1 R206.2 R207.1 | length 266.3
  Top Layer w13.78: FB39.1@4458.66,5618.11 4458.66,5648.7 4473.19,5663.22 4548.31,5663.22 4554.06,5657.48 R207.1@4586.61,5657.48 4586.61,5688.07 4567.99,5706.69 R206.2@4525.59,5706.69
$7N78: D10.5 R99.2 R283.1 | length 208.7
  Top Layer w10: R283.1@4482.28,6340.55 4482.28,6384.42 4511.25,6413.39 D10.5@4551.18,6413.39 4551.18,6432.38 4540.06,6432.38 R99.2@4501.97,6470.47
$7N80: D10.1 D16.4 R100.2 | length 688.4
  Top Layer w10: R100.2@4590.55,6470.47 4621.14,6470.47 4629.92,6461.69 D10.1@4629.92,6413.39 4629.92,6364.17 v1(4655.51,6338.58)
  Bottom Layer w13.78: D16.4@4448.82,6062.99 4448.82,6042.48 4469.67,6021.63 4585.39,6021.63 4655.51,6091.75 v1(4655.51,6338.58)
$7N82: D5.4 D16.1 R282.1 | length 422.5
  Top Layer w10: v1(4663.39,6023.62) 4674.33,6034.56 4726.26,6034.56 4736.22,6044.52 D5.4@4736.22,6064.96
  Mid Layer 2 w19.68: v1(4564.96,6173.23) 4564.96,6066.8 4608.14,6023.62 v1(4663.39,6023.62)
  Bottom Layer w13.78: R282.1@4535.43,6208.66 4560.52,6183.57 4562.49,6183.57 4562.49,6182.32 v1@4555.12,6174.95 ; D16.1@4555.12,6137.8 v1@4555.12,6174.95 ; v1(4564.96,6173.23) 4564.96,6174.95 v1@4555.12,6174.95
$7N87: D17.4 K5.2 | length 7307.3
  Top Layer w19.68: K5.2@734.25,10451.57 794.49,10451.57 v1(797.24,10448.82) ; v1(4289.37,8216.54) 4289.37,7903.96 4301.6,7891.73 4318.9,7874.44 4318.9,7803.12 4268.45,7752.67 4268.45,7406.74 v1(4316.93,7358.27)
  Mid Layer 2 w19.68: v1(2057.09,8251.97) 2080.71,8228.35 3415.57,8228.35 3474.33,8169.59 3563.01,8169.59 3604.02,8210.6 3895.7,8210.6 3996.24,8110.06 4098.25,8110.06 4204.72,8216.54 v1(4289.37,8216.54) ; v1(4316.93,7358.27) 4340.55,7334.65 4538.24,7334.65 4542.18,7330.71 v1(4576.77,7330.71)
  Bottom Layer w19.68: v1(797.24,10448.82) 797.24,10424.13 823.06,10398.32 823.06,10299.43 777.11,10253.49 777.11,10088.58 795.93,10069.76 1127.07,10069.76 1198.46,10141.15 1414.29,10141.15 1476.69,10078.74 1599.13,10078.74 1645.62,10032.26 1645.62,9957.71 1858.12,9745.21 1858.12,8916.18 2057.09,8717.21 v1(2057.09,8251.97) ; v1(4576.77,7330.71) 4633.86,7273.62 D17.4@4633.86,6954.72
$7N92: K5.1 R692.1 | length 143.5
  Top Layer w19.68: R692.1@675.2,10253.94 675.2,10329.02 697.76,10351.57 K5.1@734.25,10351.57
$7N93: C74.2 FB42.2 R692.2 | length 186.8
  Top Layer w19.68: FB42.2@679.13,10096.46 C74.2@679.13,10155.51 732.27,10208.65 750,10226.39 R692.2@750,10253.94
$7N579: D83.9 R289.2 V65.2 V70.2 | length 962
  Top Layer w10: 5722.87,8673.12 5774.29,8621.7 6134.32,8621.7 6198.82,8686.2 ; V65.2@6292.32,8686.02 V65.2@6293.31,8686.02
  Top Layer w13.78: 5722.87,8673.12 5722.87,8724.83 v1(5757.87,8759.84) 5757.87,8784.53 5745.08,8797.32 V70.2@5745.08,8885.83 ; 6198.82,8686.2 R289.2@6198.82,8728.35 6250,8728.35 V65.2@6292.32,8686.02
  Bottom Layer w19.68: v1(5757.87,8759.84) 5758.27,8759.45 D83.9@5809.06,8759.45
$7N580: D83.10 R290.2 V66.2 V71.2 | length 699.3
  Top Layer w13.78: v1(5757.87,9070.87) 5754.92,9073.82 V71.2@5754.92,9112.2 5798.72,9112.2 5808.56,9122.05 R290.2@5856.3,9122.05 5856.3,9103.03 5880.92,9078.41 5906.83,9078.41 V66.2@5932.09,9053.15
  Mid Layer 1 w10: v1(5757.87,8708.66) 5731.22,8735.32 5731.22,8770.88 5757.87,8797.54 v1(5757.87,9070.87)
  Bottom Layer w19.68: v1(5757.87,8708.66) 5758.66,8709.45 D83.10@5809.06,8709.45
$7N581: D83.12 R286.2 V67.2 V72.2 | length 624.3
  Top Layer w13.78: V72.2@5745.08,8974.41 5769.35,8950.13 5769.35,8949.15 5796.21,8922.29 5796.21,8749.06 5815.29,8729.98 5816.28,8729.98 V67.2@5840.55,8705.71 5864.83,8729.98 5865.81,8729.98 5868.11,8732.28 v1(5903.54,8732.28) 5904.28,8731.55 5904.28,8727.61 5907.98,8723.91 5909.95,8723.91 5928.15,8705.71 5935.04,8705.71 R286.2@5935.04,8698.82
  Bottom Layer w19.68: D83.12@5809.06,8609.45 5856.56,8609.45 5903.54,8656.43 v1(5903.54,8732.28)
$7N582: D18.4 D83.13 | length 838.4
  Top Layer w13.78: v1(5868.11,8559.06) 5892.8,8559.06 5907.72,8544.13 6271.56,8544.13 6336.97,8609.54 6336.97,8840.53 6358.65,8862.2 D18.4@6374.02,8862.2
  Bottom Layer w13.78: D83.13@5809.06,8559.45 5867.72,8559.45 v1(5868.11,8559.06)
$7N585: D18.2 R288.2 V69.2 V73.2 | length 963.6
  Top Layer w10: D18.2@6411.42,8968.5 D18.2@6411.42,8978.35
  Top Layer w13.78: V73.2@5754.92,9210.63 5783.54,9210.63 5828.34,9165.83 5957.13,9165.83 5964.53,9173.23 5985.24,9173.23 ; V69.2@5985.24,9141.73 5985.24,9173.23 ; R288.2@6169.29,8974.41 6204.74,8974.41 6228.86,8998.53 6228.86,9062.59 6241.68,9075.41 6241.68,9075.73 ; D18.2@6411.42,8978.35 6314.03,9075.73 6241.68,9075.73 ; 5985.24,9173.23 5999,9186.99 6130.42,9186.99 6241.68,9075.73
$7N586: D18.1 R287.2 V68.2 V74.2 | length 1184
  Top Layer w13.78: V74.2@5754.92,9309.06 5783.54,9309.06 5783.54,9308.46 5878.42,9213.58 6261.45,9213.58 6448.82,9026.22 D18.1@6448.82,8968.5 6448.82,8937.04 6430.63,8918.85 6351.28,8918.85 6315.3,8882.87 V68.2@6283.46,8882.87 6282.48,8882.87 6255.91,8856.3 R287.2@6198.82,8856.3
$7N587: D30.19 R106.2 | length 142.1
  Bottom Layer w10: D30.19@6246.06,8815.94 6288.46,8815.94 6288.46,8781.25 6273.62,8766.41 R106.2@6273.62,8722.44
$7N588: D30.1 R285.2 | length 137.8
  Bottom Layer w10: D30.1@6025.59,8790.35 6086.82,8790.35 6122.05,8755.13 R285.2@6122.05,8728.35
$7N640: H24.2 R162.2 | length 102.4
  Top Layer w19.68: v1(6525.59,9068.9) 6525.59,9062.99 H24.2@6570.87,9062.99
  Bottom Layer w19.68: R162.2@6474.41,9068.9 v1(6525.59,9068.9)
$7N641: H25.2 R161.2 | length 98.1
  Top Layer w19.68: v1(6525.59,8972.44) 6527.56,8974.41 H25.2@6570.87,8974.41
  Bottom Layer w19.68: R161.2@6474.41,8974.41 6523.62,8974.41 v1(6525.59,8972.44)
$7N642: H5.2 R160.2 | length 105.6
  Top Layer w19.68: v1(6525.59,8895.67) 6525.59,8889.76 6529.53,8885.83 H5.2@6570.87,8885.83
  Bottom Layer w19.68: R160.2@6474.41,8891.73 6521.65,8891.73 v1(6525.59,8895.67)
$7N643: H4.2 R159.2 | length 102.8
  Top Layer w19.68: v1(6525.59,8612.2) 6525.59,8616.14 6529.53,8620.08 H4.2@6570.87,8620.08
  Bottom Layer w19.68: R159.2@6474.41,8614.17 6523.62,8614.17 v1(6525.59,8612.2)
$7N644: H8.2 R158.2 | length 96.5
  Top Layer w19.68: v1(6525.59,8708.66) H8.2@6570.87,8708.66
  Bottom Layer w19.68: R158.2@6474.41,8708.66 v1(6525.59,8708.66)
$7N645: H7.2 R157.2 | length 102.8
  Top Layer w19.68: v1(6525.59,8435.04) 6525.59,8438.98 6529.53,8442.91 H7.2@6570.87,8442.91
  Bottom Layer w19.68: R157.2@6474.41,8437.01 6523.62,8437.01 v1(6525.59,8435.04)
$7N646: H6.2 R156.2 | length 98.1
  Top Layer w19.68: v1(6525.59,8795.28) 6527.56,8797.24 H6.2@6570.87,8797.24
  Bottom Layer w19.68: R156.2@6474.41,8797.24 6523.62,8797.24 v1(6525.59,8795.28)
$7N647: H3.2 R155.2 | length 96.5
  Top Layer w19.68: v1(6525.59,8531.5) H3.2@6570.87,8531.5
  Bottom Layer w19.68: R155.2@6474.41,8531.5 v1(6525.59,8531.5)
$7N648: C75.2 C134.2 C194.1 D18.5 D30.20 D83.14 FB43.1 H3.1 H4.1 H5.1 H6.1 H7.1 H8.1 H24.1 H25.1 R285.1 R286.1 R287.1 R288.1 R289.1 R290.1 | length 3630.2
  Top Layer w13.78: R290.1@5923.23,9122.05 5925.2,9122.05 5955.79,9091.46 5957.03,9091.46 5969.75,9078.74 v1(6080.71,9078.74) ; R286.1@6001.97,8698.82 6003.94,8698.82 6033.46,8728.35 v1(6080.71,8728.35) R289.1@6131.89,8728.35 ; R288.1@6102.36,8974.41 6067.34,8974.41 6053.24,8960.31 6053.24,8881.8 v1(6080.71,8854.33) 6080.71,8856.3 R287.1@6131.89,8856.3 ; C75.2@6444.88,8797.24 6444.88,8827.83 6446.69,8829.65 6448.82,8829.65 D18.5@6448.82,8862.2
  Top Layer w19.68: C75.2@6444.88,8797.24 6444.88,8446.21 6513.14,8377.95 v1(6624.02,8377.95) 6645.67,8399.61 H7.1@6645.67,8442.91 H3.1@6645.67,8531.5 H4.1@6645.67,8620.08 H8.1@6645.67,8708.66 H6.1@6645.67,8797.24 H5.1@6645.67,8885.83 H25.1@6645.67,8974.41 H24.1@6645.67,9062.99
  Mid Layer 1 w10: v1(6080.71,8728.35) v1(6080.71,8854.33) 6051,8884.03 6051,9049.04 v1(6080.71,9078.74)
  Bottom Layer w10: v1(6080.71,8854.33) 6127.46,8854.33 6191.44,8790.35 D30.20@6246.06,8790.35 6246.06,8772.56 6226.94,8753.44 6216.04,8753.44 6190.94,8728.35 R285.1@6188.98,8728.35
  Bottom Layer w19.68: D83.14@5809.06,8509.45 5850.47,8509.45 5864.65,8523.62 C134.2@5948.82,8523.62 6126.89,8523.62 6134.76,8515.75 FB43.1@6165.35,8515.75 ; R285.1@6188.98,8728.35 6188.98,8695.87 6192.91,8691.93 C194.1@6192.91,8649.61 6192.91,8609.17 6165.35,8581.61 FB43.1@6165.35,8515.75 ; v1(6624.02,8377.95) 6341.08,8377.95 6204.62,8514.42 6197.27,8514.42 6195.94,8515.75 FB43.1@6165.35,8515.75
$7N1593: D89.4 R710.1 R715.2 | length 152.2
  Top Layer w13.78: D89.4@5252.36,8641.73 5252.36,8618.62 5253.94,8617.05 R715.2@5253.94,8570.87 5318.9,8570.87 R710.1@5318.9,8586.61
$7N1594: D89.3 R718.2 | length 64
  Top Layer w13.78: R718.2@5092.52,8624.02 5110.24,8641.73 D89.3@5149.21,8641.73
$7N1602: C76.2 C140.2 D89.5 FB44.1 R291.1 R710.2 | length 621.9
  Top Layer w13.78: D89.5@5252.36,8679.13 5293.31,8679.13 R710.2@5318.9,8653.54 5375.69,8653.54 5397.54,8675.4 5397.54,8747.7 5357.84,8787.4 R291.1@5234.25,8787.4 5234.25,8802.09 5248.03,8815.87 C140.2@5248.03,8856.3 5253.94,8862.2 C76.2@5253.94,8925.2 FB44.1@5253.94,8984.25
$7N1603: D90.4 R711.1 R716.2 | length 207.7
  Bottom Layer w13.78: D90.4@4533.86,8726.38 4573.74,8726.38 4589.49,8742.13 R711.1@4649.61,8742.13 4649.61,8791.34 R716.2@4624.02,8816.93
$7N1604: D90.3 R719.2 | length 99.6
  Bottom Layer w13.78: R719.2@4389.76,8797.24 4389.76,8770.37 4410.65,8749.49 4410.65,8726.38 D90.3@4430.71,8726.38
$7N1605: D85.5 D85.6 D90.6 R295.1 | length 586.4
  Bottom Layer w10: R295.1@4846.46,8753.94 4879.84,8753.94 4884.76,8749.02 D85.5@4927.17,8749.02 D85.6@4927.17,8774.61
  Bottom Layer w13.78: D90.6@4533.86,8651.57 4533.86,8632.57 4559.49,8606.94 4827.45,8606.94 4846.46,8625.95 R295.1@4846.46,8753.94
$7N1607: C78.2 C141.2 D90.5 FB45.1 R294.1 R711.2 | length 500.3
  Mid Layer 1 w19.68: v1(4584.65,8570.87) 4584.65,8620.08 4588.58,8624.02 v1(4588.58,8673.23)
  Bottom Layer w13.78: R294.1@4525.59,8570.87 v1(4584.65,8570.87) C78.2@4635.83,8570.87 ; D90.5@4533.86,8688.98 4576.77,8688.98 4584.65,8681.1 4584.65,8677.17 v1(4588.58,8673.23) 4617.05,8673.23 4619.02,8675.2 R711.2@4649.61,8675.2 4676.18,8675.2 4682.09,8681.1 C141.2@4728.35,8681.1 4753.94,8655.51 FB45.1@4797.24,8655.51
$7N1608: D61.4 D90.1 R294.2 | length 217.7
  Top Layer w13.78: v1(4383.86,8645.67) 4415.35,8645.67 4425.2,8655.51 D61.4@4454.72,8655.51
  Bottom Layer w13.78: v1(4383.86,8645.67) 4389.76,8651.57 D90.1@4430.71,8651.57 4430.71,8596.85 4456.69,8570.87 R294.2@4458.66,8570.87
$7N1612: D86.5 D86.6 D89.6 R293.1 | length 317
  Top Layer w13.78: D89.6@5252.36,8716.54 5331.61,8716.54 5335.55,8712.6 v1(5360.24,8712.6)
  Bottom Layer w10: R293.1@5230.31,8714.57 5260.91,8714.57 5271.73,8725.39 D86.6@5311.02,8725.39 v1@5359.87,8725.39 ; D86.5@5311.02,8699.8 5336.06,8699.8 5348.8,8712.55 5359.87,8723.62 v1@5359.87,8725.39 ; v1(5360.24,8712.6) 5360.24,8725.03 v1@5359.87,8725.39
$7N2042: C79.2 C135.2 C193.1 C213.2 D19.5 D34.5 D64.5 D65.5 D66.5 D92.5 FB47.2 R296.1 R297.1 R301.1 R302.1 R303.1 R304.1 | length 2031.6
  Top Layer w10: FB47.2@3748.03,8580.71 3811.02,8580.71 v1(3844.49,8614.17) D65.5@3883.86,8614.17
  Top Layer w13.78: C79.2@3807.09,8108.27 3858.27,8108.27 v1(3864.17,8114.17) 3862.2,8116.14 R296.1@3862.2,8163.39 3892.8,8163.39 3894.61,8165.2 3894.61,8167.32 R304.1@3927.17,8167.32 R297.1@3927.17,8226.38 3925.2,8226.38 3897.64,8253.94 D66.5@3897.64,8297.24 3887.8,8297.24 3852.36,8332.68 v1(3852.36,8409.45)
  Top Layer w19.68: C135.2@3537.4,8346.46 3565.73,8318.13 3588.58,8318.13 ; v1(3588.58,8283.46) 3588.58,8318.13 ; D19.5@3651.57,8425.2 3662.28,8425.2 3662.28,8399.68 3657.84,8395.23 R303.1@3657.84,8364.17 ; R303.1@3671.26,8364.17 R303.1@3657.84,8364.17 ; 3588.58,8318.13 3588.58,8321.29 3631.46,8364.17 R303.1@3657.84,8364.17
  Bottom Layer w10: v1(3588.58,8283.46) 3588.58,8321.78 ; R302.1@3803.15,8084.65 3834.65,8084.65
  Bottom Layer w13.78: v1(3588.58,8283.46) D92.5@3631.89,8283.46 ; 3588.58,8321.78 3683.8,8417 3683.8,8574.57 3693.88,8584.65 C213.2@3753.94,8584.65 3753.94,8586.61 3781.5,8614.17 v1(3844.49,8614.17) 3844.49,8572.83 3905.51,8511.81 R301.1@3907.48,8511.81 3907.48,8476.21 3887.8,8456.53 D64.5@3887.8,8440.94 3877.95,8440.94 3852.36,8415.35 v1(3852.36,8409.45) ; 3834.65,8084.65 v1(3864.17,8114.17) 3942.91,8114.17 C193.1@3942.91,8088.58 3973.91,8119.58 3973.91,8182.59 3959.65,8196.85 D34.5@3927.17,8196.85
$7N2044: D34.3 D66.1 D66.2 R109.2 R297.2 R587.2 | length 479.5
  Top Layer w13.78: D66.2@4003.94,8334.65 D66.1@4003.94,8297.24 4003.94,8274.53 3994.09,8264.68 R297.2@3994.09,8226.38 3996.06,8226.38 4047.51,8174.94 4059.32,8174.94 v1(4076.77,8157.48)
  Bottom Layer w10: 4106.8,8064.46 4108.77,8064.46 R109.2@4133.86,8039.37
  Bottom Layer w13.78: D34.3@4033.46,8159.45 4074.8,8159.45 v1(4076.77,8157.48) 4076.77,8094.49 4106.8,8064.46
  Bottom Layer w19.68: R587.2@4133.86,7970.47 R109.2@4133.86,8039.37
$7N2339: D34.6 D64.2 R111.2 R296.2 R589.2 | length 647.7
  Top Layer w13.78: v1(3860.24,8275.59) 3862.2,8273.62 R296.2@3862.2,8230.32
  Bottom Layer w13.78: v1(3860.24,8275.59) 3901.57,8234.25 D34.6@3927.17,8234.25 3927.17,8258.47 3993.5,8324.8 R589.2@4133.86,8324.8 ; D64.2@3994.09,8403.54 4085.71,8403.54 4133.86,8355.39 R589.2@4133.86,8324.8 ; R111.2@4133.86,8255.91 R589.2@4133.86,8324.8
$7N2389: D64.4 D65.1 | length 237.9
  Top Layer w10: v1(3848.43,8500) 3856.3,8507.87 D65.1@3883.86,8507.87
  Bottom Layer w13.78: v1(3848.43,8500) 3812.28,8463.86 3812.28,8409.09 3855.24,8366.14 D64.4@3887.8,8366.14
$7N2417: D91.4 R712.1 R717.2 | length 159.8
  Bottom Layer w13.78: R717.2@4151.57,8511.81 4151.57,8551.18 4147.64,8555.12 R712.1@4147.64,8596.46 4189.09,8596.46 4195.39,8602.76 D91.4@4218.5,8602.76
$7N2418: D91.3 R720.2 | length 102.6
  Bottom Layer w13.78: R720.2@4202.76,8403.54 4202.76,8448.94 4218.5,8464.68 D91.3@4218.5,8499.61
$7N2419: C80.2 C142.2 D91.5 FB48.1 R298.1 R712.2 | length 445.1
  Bottom Layer w10: R298.1@4374.02,8564.96 4374.02,8614.17
  Bottom Layer w13.78: C80.2@4078.74,8663.39 R712.2@4147.64,8663.39 4197.76,8663.39 4205.63,8671.26 C142.2@4246.06,8671.26 ; D91.5@4255.91,8602.76 4255.91,8661.42 C142.2@4246.06,8671.26 ; 4374.02,8614.17 4324.8,8663.39 FB48.1@4324.8,8665.35 4294.21,8665.35 4288.31,8671.26 C142.2@4246.06,8671.26
$7N2424: D62.4 D91.1 R298.2 | length 382.7
  Top Layer w13.78: D62.4@4500,8574.8 4500,8564.96 4529.53,8535.43 v1(4568.9,8535.43)
  Bottom Layer w10: 4341.85,8499.61 4343.43,8498.03 R298.2@4374.02,8498.03
  Bottom Layer w13.78: D91.1@4293.31,8499.61 4341.85,8499.61 ; R298.2@4374.02,8498.03 4439.78,8498.03 4477.18,8535.43 v1(4568.9,8535.43)
$7N2425: D63.1 D63.2 D91.6 R299.1 | length 738.6
  Top Layer w10: 4544.12,8956.37 4636.6,8956.37 4649.61,8943.36 D63.2@4649.61,8909.45 D63.1@4687.01,8909.45 4709.72,8909.45 4727.28,8891.89 4727.28,8889.76 R299.1@4757.87,8889.76
  Top Layer w13.78: v1(4328.74,8606.3) 4328.74,8740.99 4544.12,8956.37
  Bottom Layer w13.78: D91.6@4293.31,8602.76 4325.2,8602.76 v1(4328.74,8606.3)
$7N2515: D61.1 D63.4 | length 105.6
  Top Layer w13.78: D61.1@4529.53,8761.81 4580.71,8761.81 4612.2,8793.31 D63.4@4612.2,8803.15
$7N2519: D62.1 D62.2 R110.2 R300.2 | length 192.9
  Top Layer w13.78: R300.2@4354.33,8488.19 4377.19,8488.19 4396.87,8468.5 D62.1@4425.2,8468.5 D62.2@4462.6,8468.5 4462.6,8435.94 4466.54,8432.01 R110.2@4466.54,8393.7
$7N2941: D64.1 R108.2 R301.2 | length 153.2
  Bottom Layer w13.78: R108.2@3964.57,8580.71 3964.57,8550.12 3972.28,8542.4 3974.41,8542.4 R301.2@3974.41,8511.81 3974.41,8486.68 3994.09,8466.99 D64.1@3994.09,8440.94
$7N2992: D92.2 R112.1 R302.2 R586.2 | length 258
  Bottom Layer w13.78: R112.1@3738.19,8108.27 3756.89,8108.27 3756.89,8138.86 3769.61,8151.57 R302.2@3803.15,8151.57 R586.2@3803.15,8242.13 3774.68,8242.13 3770.75,8246.06 D92.2@3738.19,8246.06
$7N2995: D34.4 D92.1 | length 445.3
  Bottom Layer w10: D92.1@3738.19,8283.46 3714.91,8306.75 3714.91,8330.02 3736.82,8351.93 3821.11,8351.93 3835.55,8337.49 3835.55,8187.23 3863.33,8159.45 D34.4@3927.17,8159.45
$7N3043: D19.1 R118.1 R303.2 | length 179.1
  Top Layer w10: R118.1@3718.5,8285.43 3718.5,8364.17 R303.2@3738.19,8364.17
  Top Layer w19.68: R303.2@3738.19,8364.17 3757.87,8364.17 D19.1@3757.87,8425.2
$7N3177: C72.2 C138.2 C211.2 D10.8 D16.5 D80.5 R207.2 R281.2 R282.2 R283.2 | length 1853.3
  Top Layer w10: C138.2@4501.97,6200.07 4580.3,6200.07 4590.55,6210.32 D10.8@4590.55,6240.16
  Top Layer w13.78: C138.2@4501.97,6177.17 4501.97,6200.07 4501.97,6213.66 4482.28,6233.35 R283.2@4482.28,6273.62 4501.28,6273.62 4558.37,6330.71 v1(4608.27,6330.71) ; R207.2@4653.54,5657.48 4690.94,5657.48 v1(4694.88,5661.42) ; D80.5@4797.24,5822.83 4814.63,5840.22 4840.22,5840.22 v1(4844.49,5844.49) 4850.39,5838.58 C211.2@4885.83,5838.58
  Mid Layer 2 w19.68: v1(4694.88,5661.42) 4694.88,5694.88 v1(4844.49,5844.49)
  Bottom Layer w13.78: C72.2@4468.5,6326.77 4468.5,6288.57 4475.57,6281.5 ; v1(4608.27,6330.71) 4610.24,6328.74 R281.2@4610.24,6281.5 4475.57,6281.5 ; v1(4694.88,5661.42) 4664.61,5691.69 4572.71,5691.69 4398.54,5865.86 4398.54,6113.51 4416.18,6131.15 4416.26,6131.15 4422.91,6137.8 D16.5@4448.82,6137.8 4468.5,6137.8 R282.2@4468.5,6208.66 4468.5,6239.25 4468.32,6239.43 4468.32,6274.25 4475.57,6281.5
$7N3269: R557.1 X22.19 | length 560.1
  Top Layer w19.68: X22.19@5274.02,8078.74 5226.4,8126.35 5226.4,8354.82 5271.66,8400.08 5355.71,8400.08 5392.64,8437.01 R557.1@5456.69,8437.01
$7N3270: R113.2 X22.14 | length 130.8
  Bottom Layer w19.68: X22.14@4974.02,8178.74 4974.02,8233.86 4994.09,8253.94 R113.2@4994.09,8301.18
$7N3271: R114.1 X22.15 | length 312.9
  Bottom Layer w19.68: X22.15@5074.02,8078.74 5045.43,8107.33 5045.43,8108.37 5024.11,8129.68 5024.11,8246.23 5088.91,8311.02 R114.1@5122.05,8311.02
$7N3272: R116.2 X22.16 | length 180.7
  Bottom Layer w19.68: X22.16@5074.02,8178.74 5165.85,8270.58 5165.85,8283.96 5190.94,8309.06 R116.2@5190.94,8311.02
$7N3273: R115.1 X22.17 | length 351.9
  Bottom Layer w19.68: X22.17@5174.02,8078.74 5222.94,8127.66 5310.74,8127.66 5338.58,8155.5 R115.1@5338.58,8311.02
$7N3274: R117.2 X22.18 | length 171.9
  Bottom Layer w19.68: X22.18@5174.02,8178.74 5244.59,8249.32 5244.59,8285.93 R117.2@5269.69,8311.02
$7N3275: R503.2 X22.13 | length 256.6
  Top Layer w19.68: R503.2@4915.35,7846.46 4915.35,8020.08 X22.13@4974.02,8078.74
$7N3276: C245.1 R503.1 TP41.1 | length 881
  Top Layer w19.68: R503.1@4915.35,7779.53 4941.41,7753.48 ; 4941.45,7753.48 5062.26,7632.67 5266.53,7632.67 TP41.1@5486.22,7852.36 5545.28,7793.31 C245.1@5620.08,7793.31
$7N3317: R505.2 X22.2 | length 392.6
  Top Layer w19.68: R505.2@4364.17,7846.46 4364.17,7907.14 4324.91,7946.4 4324.91,8170.06 4333.58,8178.74 X22.2@4374.02,8178.74
$7N3322: R499.2 X22.4 | length 365.6
  Top Layer w19.68: R499.2@4452.76,7846.46 4423.19,7876.02 4423.19,8127.92 X22.4@4474.02,8178.74
$7N3551: R168.2 X28.9 | length 393.4
  Top Layer w19.68: R168.2@5929.13,9322.83 5929.13,9507.48 X28.9@6076.77,9655.12
$7N3687: D19.2 D65.2 D66.4 | length 301.4
  Top Layer w13.78: D19.2@3757.87,8462.6 3859.46,8462.6 3897.64,8424.42 ; D66.4@3897.64,8372.05 3897.64,8424.42 ; D65.2@3921.26,8507.87 3921.26,8447.67 3898.01,8424.42 3897.64,8424.42
$7N3708: OSC30.1 R116.1 | length 55.1
  Bottom Layer w10: R116.1@5190.94,8377.95 OSC30.1@5190.94,8433.07
$7N3715: OSC31.1 R117.1 | length 55.1
  Bottom Layer w10: R117.1@5269.69,8377.95 OSC31.1@5269.69,8433.07
$7N3745: D34.1 R119.2 R304.2 R588.2 | length 445
  Top Layer w13.78: R304.2@3994.09,8167.32 4039.51,8121.91 4092.83,8121.91 4110.78,8139.87 4110.78,8202.21 v1(4076.77,8236.22)
  Bottom Layer w13.78: D34.1@4033.46,8234.25 4076.77,8234.25 v1(4076.77,8236.22) 4095.56,8217.43 4101.47,8217.43 4131.89,8187.01 R588.2@4133.86,8187.01 R119.2@4133.86,8118.11
$7N3786: D61.2 R107.2 R292.2 | length 280
  Top Layer w13.78: D61.2@4492.13,8761.81 4492.13,8729.25 4509.11,8712.27 4599,8712.27 4609.17,8722.44 R292.2@4639.76,8722.44 R107.2@4728.35,8722.44
$7N3787: D67.4 D89.1 R291.2 | length 251.2
  Top Layer w13.78: D67.4@5007.87,8641.73 5025.09,8658.95 5045.33,8658.95 5102.92,8716.54 D89.1@5149.21,8716.54 5149.21,8739.65 5166.38,8756.81 5167.32,8756.81 R291.2@5167.32,8787.4
$7N3788: R495.2 X22.6 | length 390.4
  Top Layer w19.68: R495.2@4561.02,7846.46 4497.35,7910.13 4497.35,7982.48 4524.02,8009.14 4524.02,8128.74 X22.6@4574.02,8178.74
$7N3790: R506.2 X22.10 | length 381.7
  Top Layer w19.68: X22.10@4774.02,8178.74 4721.02,8125.74 4721.02,7945.78 4787.4,7879.4 R506.2@4787.4,7846.46
$7N3791: R494.2 X22.8 | length 371.7
  Top Layer w19.68: R494.2@4669.29,7846.46 4644.2,7871.55 4644.2,7873.52 4624.11,7893.6 4624.11,8128.84 X22.8@4674.02,8178.74
$7N3804: R171.1 X28.2 | length 287.9
  Bottom Layer w13.78: R171.1@6342.52,9322.83 6342.52,9363.88 6476.77,9498.14 X28.2@6476.77,9555.12
$7N3805: R167.2 X28.1 | length 412.4
  Bottom Layer w13.78: R167.2@6283.46,9322.83 6283.46,9369.3 6426.77,9512.61 6426.77,9605.12 X28.1@6476.77,9655.12
$7N3806: R170.1 X28.4 | length 295.4
  Bottom Layer w13.78: R170.1@6224.41,9322.83 6224.41,9355.39 6240.86,9371.84 6240.86,9413.33 6348.18,9520.65 6348.18,9526.53 X28.4@6376.77,9555.12
$7N3807: R164.1 X28.3 | length 419.9
  Bottom Layer w13.78: R164.1@6165.35,9322.83 6165.35,9377.48 6326.77,9538.9 6326.77,9605.12 X28.3@6376.77,9655.12
$7N3808: R169.1 X28.6 | length 302.9
  Bottom Layer w13.78: R169.1@6106.3,9322.83 6106.3,9358.11 6248.18,9499.99 6248.18,9526.53 X28.6@6276.77,9555.12
$7N3809: R166.2 X28.5 | length 455
  Bottom Layer w13.78: R166.2@6047.24,9322.83 6047.24,9350.84 6096.58,9400.17 6096.58,9447.48 6132.25,9483.15 6179.39,9483.15 6221.75,9525.52 6221.75,9600.1 X28.5@6276.77,9655.12
$7N3810: R163.2 X28.8 | length 345.8
  Bottom Layer w13.78: R163.2@5988.19,9322.83 5988.19,9426.97 6048.46,9487.24 6082.55,9487.24 6120.5,9525.19 6146.84,9525.19 X28.8@6176.77,9555.12
$7N3811: R165.2 X28.7 | length 507.4
  Bottom Layer w13.78: R165.2@5929.13,9322.83 5929.13,9531.26 6002.99,9605.12 6126.77,9605.12 X28.7@6176.77,9655.12
$7N3814: D67.1 D67.2 R120.2 R305.2 | length 191.5
  Top Layer w13.78: R120.2@4836.61,8673.23 4867.2,8673.23 4869.02,8675.04 4869.02,8679.13 D67.2@4901.57,8679.13 D67.1@4901.57,8716.54 4901.57,8759.84 4929.13,8787.4 R305.2@4931.1,8787.4
$7N3864: C77.2 C81.2 C82.2 C143.2 C192.1 C212.2 D61.5 D62.5 D63.5 D67.5 D85.8 D86.8 FB44.2 FB45.2 FB46.1 FB48.2 R292.1 R293.2 R295.2 R299.2 R300.1 R305.1 | length 2648.2
  Top Layer w10: R300.1@4354.33,8555.12 4354.33,8690.42 4364.17,8700.26 v1(4364.17,8732.28) ; v1(4714.57,8846.46) 4717.38,8843.65 R299.2@4757.87,8843.65 ; 4872.05,8850.39 v1(4887.8,8850.39)
  Top Layer w13.78: C77.2@4285.43,8555.12 R300.1@4354.33,8555.12 4384.92,8555.12 4402.48,8572.68 4402.48,8574.8 D62.5@4425.2,8574.8 4460.63,8610.24 4484.25,8610.24 D61.5@4529.53,8655.51 4554.13,8655.51 4563.07,8646.58 4607.28,8646.58 4616.22,8655.51 R292.1@4639.76,8655.51 4665.35,8655.51 v1(4683.07,8637.8) ; D63.5@4687.01,8803.15 4701.98,8803.15 4714.57,8815.73 v1(4714.57,8846.46) ; R299.2@4757.87,8843.65 R299.2@4757.87,8822.83 4790.35,8822.83 4794.29,8818.9 C192.1@4836.61,8818.9 4840.55,8818.9 v1@4872.05,8850.39 ; D67.5@5007.87,8716.54 5007.87,8746.97 4998.03,8756.81 R305.1@4998.03,8787.4 C82.2@4998.03,8856.3 5043.31,8856.3 v1(5045.28,8858.27) ; C212.2@5092.52,8830.71 5092.52,8832.68 5066.93,8858.27 v1(5045.28,8858.27) ; FB44.2@5187.01,8984.25 5185.04,8984.25 5145.67,8944.88 FB46.1@5066.93,8944.88 5066.93,8914.29 5045.28,8892.64 v1(5045.28,8858.27)
  Mid Layer 1 w19.68: v1(4683.07,8637.8) 4714.57,8669.29 v1(4714.57,8846.46)
  Mid Layer 2 w19.68: v1(5045.28,8858.27) 5091.62,8811.92 5258.77,8811.92 v1(5305.12,8858.27)
  Bottom Layer w10: v1(4887.8,8850.39) 4884.76,8847.36 4884.76,8846.81 4891.22,8840.36 4905.79,8825.79 D85.8@4927.17,8825.79 4927.17,8842.6 4942.83,8858.27 v1(5045.28,8858.27) ; R293.2@5230.31,8781.5 5263.7,8781.5 5268.62,8776.57 D86.8@5311.02,8776.57 5311.02,8816.93 C143.2@5350.39,8856.3
  Bottom Layer w13.78: FB48.2@4324.8,8732.28 v1(4364.17,8732.28) ; FB45.2@4797.24,8722.44 4797.24,8760.13 4817.92,8780.8 4817.92,8792.32 R295.2@4846.46,8820.87 ; C81.2@4803.15,8895.67 4805.12,8895.67 4836.61,8864.17 4836.61,8820.87 R295.2@4846.46,8820.87 ; v1(4887.8,8850.39) 4874.02,8850.39 4846.46,8822.83 R295.2@4846.46,8820.87 ; v1(5305.12,8858.27) 5307.09,8856.3 C143.2@5350.39,8856.3
$7N3865: R501.2 X22.12 | length 139.6
  Bottom Layer w19.68: X22.12@4874.02,8178.74 4915.35,8220.08 R501.2@4915.35,8301.18
$7N3868: R500.2 X22.3 | length 142.9
  Bottom Layer w19.68: X22.3@4474.02,8078.74 4531.6,8021.15 4555.62,8021.15 4580.71,7996.06 R500.2@4580.71,7994.09
$7N3869: R498.2 X22.9 | length 248.9
  Bottom Layer w19.68: R498.2@4738.19,8301.18 4738.19,8245.09 4724.13,8231.03 4724.13,8128.63 X22.9@4774.02,8078.74
$7N3872: R504.2 X22.11 | length 247.3
  Bottom Layer w19.68: R504.2@4836.61,8301.18 4836.61,8268.62 4825.29,8257.3 4825.29,8127.47 X22.11@4874.02,8078.74
$7N3873: R496.2 X22.1 | length 246.9
  Bottom Layer w19.68: X22.1@4374.02,8078.74 4424.45,8129.18 4424.45,8260 4433.07,8268.62 R496.2@4433.07,8301.18
$7N3875: R497.2 X22.5 | length 244.1
  Bottom Layer w19.68: R497.2@4521.65,8301.18 4521.65,8131.1 X22.5@4574.02,8078.74
$7N3876: R502.2 X22.7 | length 244.7
  Bottom Layer w19.68: R502.2@4629.92,8301.18 4629.92,8268.62 4625.12,8263.82 4625.12,8127.64 X22.7@4674.02,8078.74